# Altium PCB Connector_Board.PcbDoc
Units mil, origin at the board's own origin, x right, y up, seen from the top; angles counter-clockwise.
Board outline 3200 x 2600 mil, 2 copper layers (Top Layer, Bottom Layer); 6 components, 4 nets, 41 pads, 12 vias.
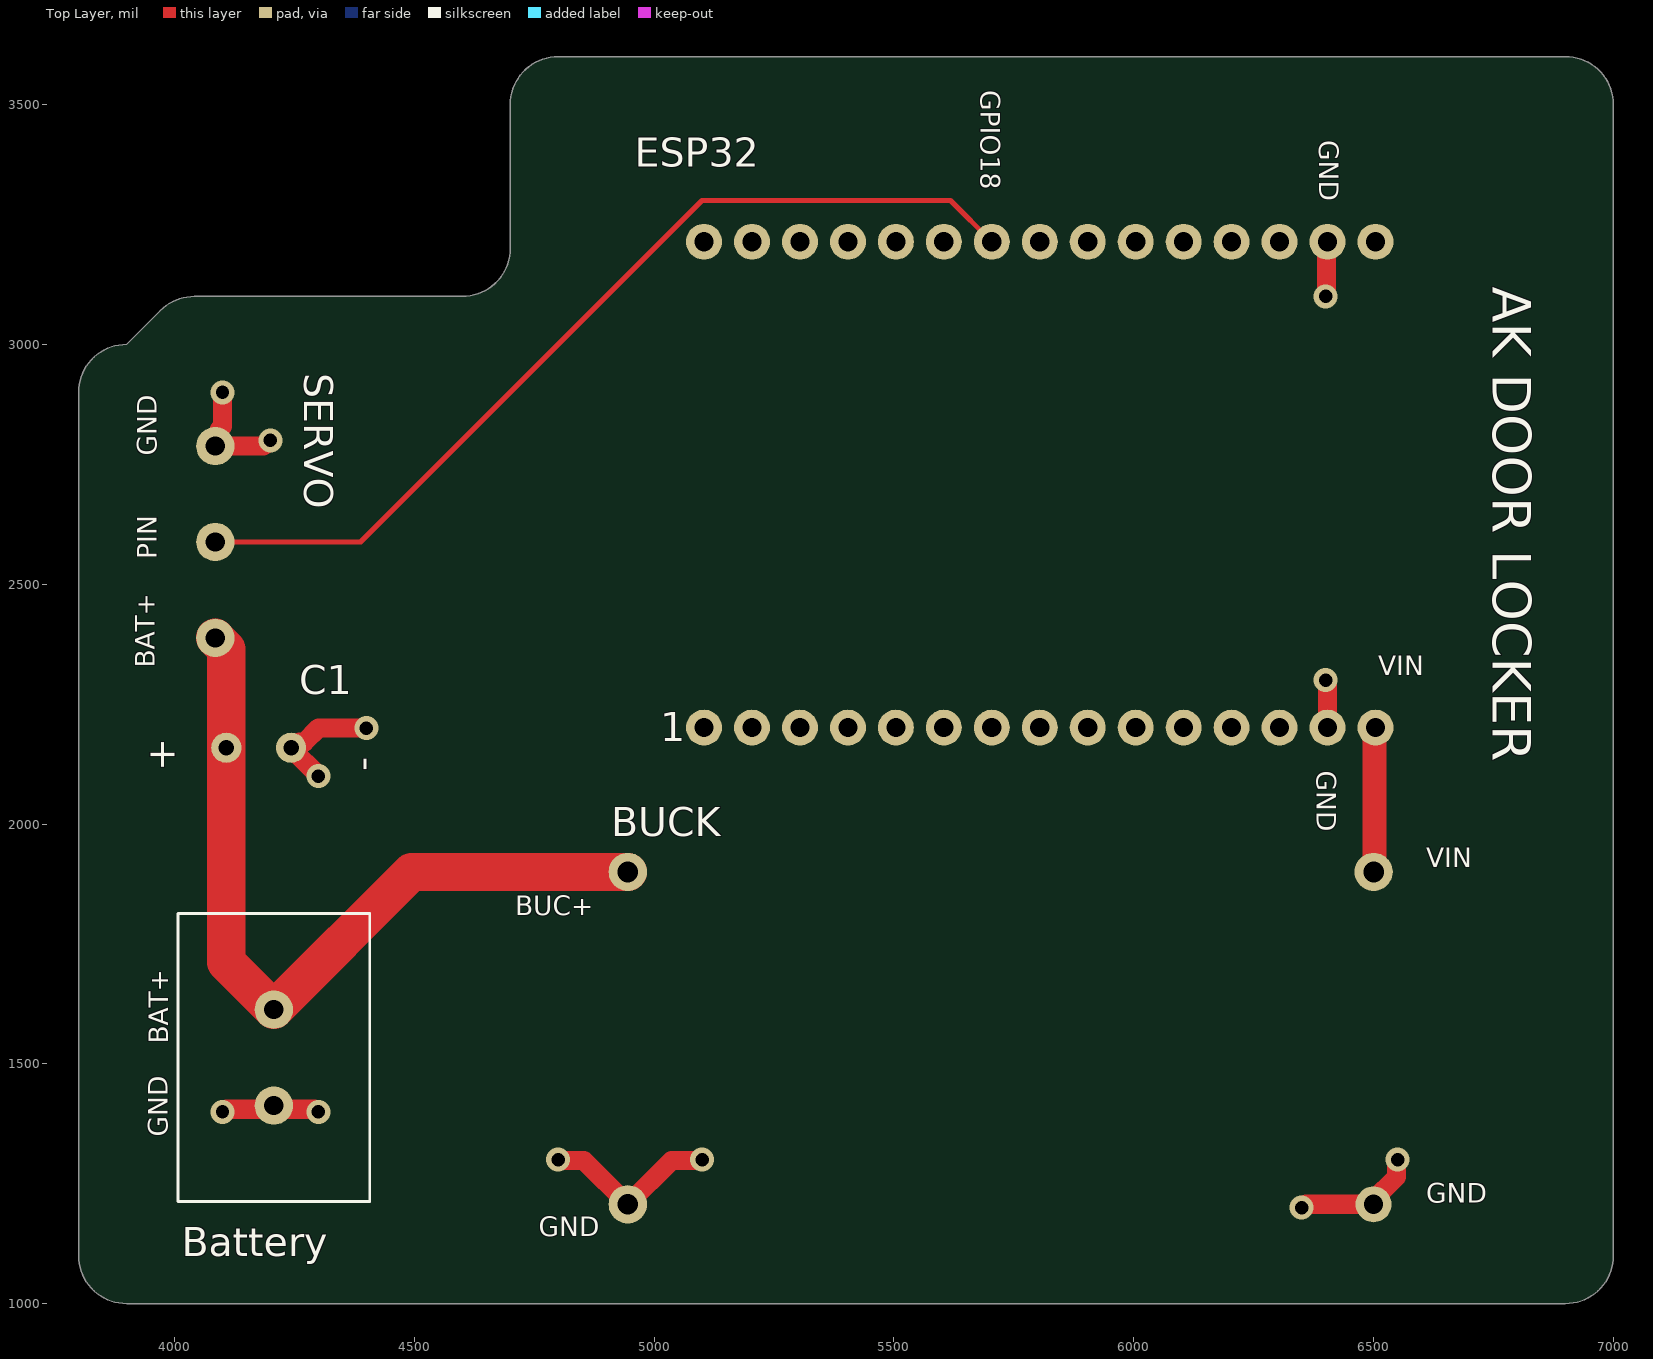
[diagram p0: Top Layer view]
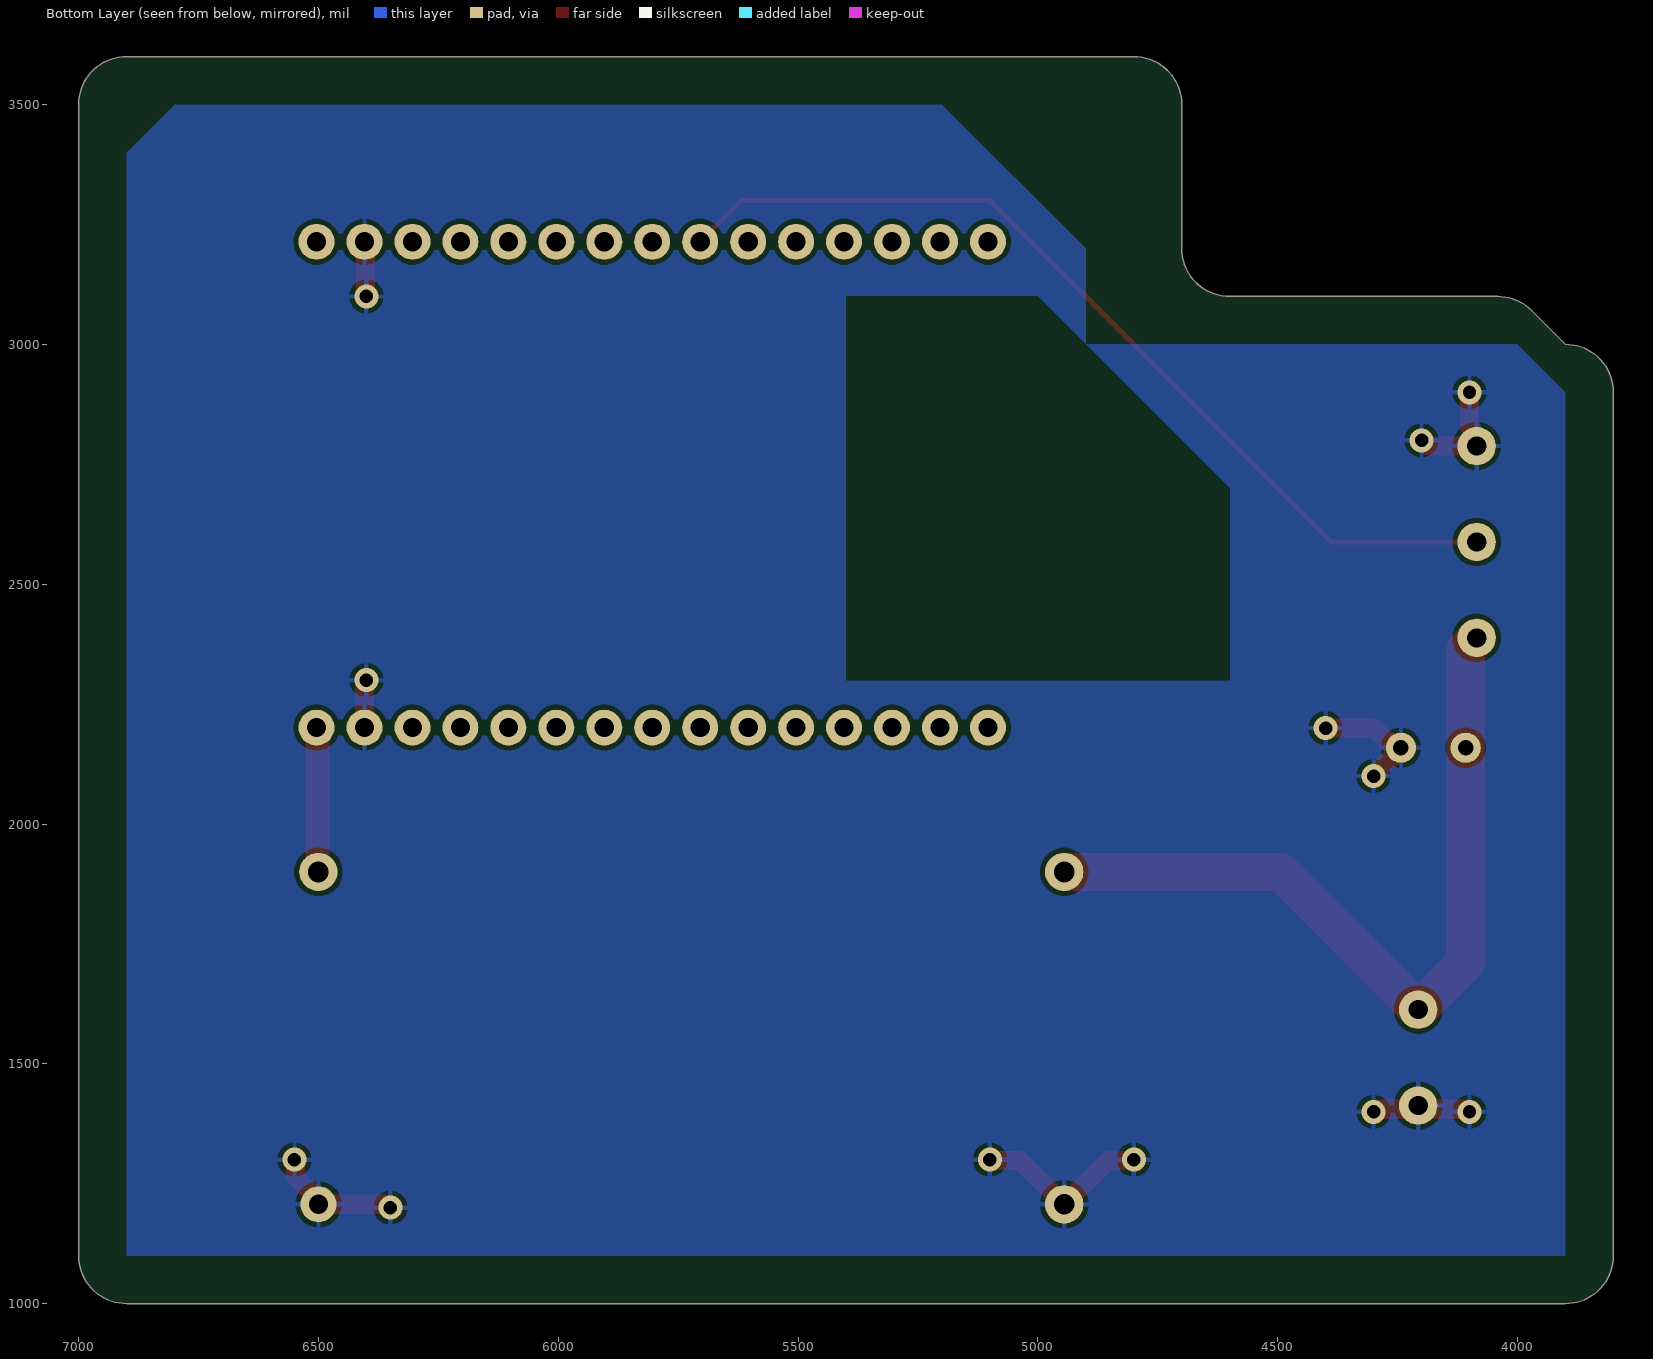
[diagram p1: Bottom Layer view, seen from below]

## Layer stack, top to bottom
Top Solder: solder mask 0.4, Solder Resist, Dk 3.5
Top Layer: signal copper 1.4
Dielectric 1: dielectric 12.6, FR-4, Dk 4.8
Bottom Layer: signal copper 1.4
Bottom Solder: solder mask 0.4, Solder Resist, Dk 3.5

## Board outline
3800,2900 cw(c3900,2900) 3900,3000 3970.71,3070.71 cw(c4041.42,3000) 4041.42,3100 4600,3100 ccw(c4600,3200) 4700,3200 4700,3500 cw(c4800,3500) 4800,3600 6900,3600 cw(c6900,3500) 7000,3500 7000,1100 cw(c6900,1100) 6900,1000 3900,1000 cw(c3900,1100) 3800,1100

## Design rules (kind name [scope] priority, off if disabled: settings)
Clearance [All] p1: gap=10 ignorepadtopadclearanceinfootprint=FALSE
PolygonConnect [All] p1: connectstyle=Relief reliefconductorwidth=10 reliefentries=4 polygonreliefangle="90 Angle" airgapwidth=10
RoutingVias [All] p1: holewidth=28 width=50 viastyle="Through Hole" minholewidth=28 minwidth=50 maxholewidth=28 maxwidth=50
SolderMaskExpansion [All] p1: expansion=4 istentingtop=FALSE
SupplyNets "Schematic Supply Nets_2" [InNet('BAT +')] p1: voltage=0.000
SupplyNets "Schematic Supply Nets_1" [InNet('VIN')] p2: voltage=0.000
SupplyNets "Schematic Supply Nets" [InNet('GND')] p3: voltage=0.000
Width [All] p1: maxlimit=100 minlimit=10 preferedwidth=10 bottomlayer_maxwidth=10 minimp=50.000000 maximp=50.000000 favimp=50.000000
30 further rules are at their usual default settings.

## Classes and differential pairs
component class door_sch: Battery C1 ESP32

## Components (designator, comment, footprint, x,y, rotation, side; value= is the part's Value field where it differs from the comment)
1 "J2 Header1x15" SOCKET_1x15_P2.54 6504,2201 r270 top
Battery "Battery connector" BAT_1x2_CONNECTOR 4207,1613 r270 top (schematic designator *)
BUCK "Buck_CONV_PINS" BUCK_1X4_CONNECTOR 4945,1900 r0 top (schematic designator *)
C1 "Capacitor" CAPCITOR_1X2 4108,2159 r90 top value=470u
ESP32 "J1 Header1x15" SOCKET_1x15_P2.54 6504,3214 r270 top (schematic designator 1)
SERVO "SERVO_PINS" SERVO_1X3_CONNECTOR 4085,2388 r90 top (schematic designator 1)

## Footprints (in the part's own frame and the unit in brackets; to place one, negate y for a bottom-side part, rotate by r counter-clockwise, add the part's x,y. Pads: shape width x height; smd on the part's side, far side on the other; paste and mask are expansions set on the pad)
BAT_1x2_CONNECTOR [mil]
  round 80 hole 40: 1(0,0) 2(200,0)
  silkscreen extent -200,-200 400,200
BUCK_1X4_CONNECTOR [mil]
  round 80 hole 43: 1(0,0) 2(0,-693) 3(1555,0)
  round 75 hole 40: 4(1555,-693)
CAPCITOR_1X2 [mil]
  round 63 hole 32: 1(0,0) 2(0,-135)
SERVO_1X3_CONNECTOR [mil]
  round 80 hole 40: 1(0,0) 2(200,0) 3(400,0)
SOCKET_1x15_P2.54 [mil]
  round 75 hole 40: 1(0,0) 2(0,-100) 3(0,-200) 4(0,-300) 5(0,-400) 6(0,-500) 7(0,-600) 8(0,-700) 9(0,-800) 10(0,-900) 11(0,-1000) 12(0,-1100) 13(0,-1200) 14(0,-1300) 15(0,-1400)

## Part data
1 ESP32: library part Header1x15, "1x15 connector for ESP32 dev board"
C1: SimulationGenericComponent=True

## Via types
v1: diameter 50, hole 28, Top Layer to Bottom Layer, 12 vias

## Nets (pads, with @x,y where several pads share a name; then routed paths per layer and width w, separated by ;. In a path a pad name is that pad's centre, name@x,y a point inside that pad or via, vN(x,y) a via of type N, cw(c..) or ccw(c..) an arc to the next point about the centre after c; other vN are vias at no path point)
"BAT +": Battery.1 BUCK.1 C1.1 SERVO.1 | length 1682.4
  Top Layer w80: SERVO.1 4108,2365 C1.1 4108,1712 Battery.1 4494,1900 BUCK.1
GND: 1.2 Battery.2 BUCK.2 BUCK.4 C1.2 ESP32.2 SERVO.3 | length 1568.2
  Top Layer w40: v1(4100,1400) 4102.71,1400 4108.05,1405.35 4199.35,1405.35 Battery.2 4214.65,1405.35 4291.95,1405.35 4297.29,1400 v1(4300,1400) ; v1(4100,2900) 4100,2829.13 4092.65,2821.78 4092.65,2795.65 SERVO.3 4185.29,2788 4197.29,2800 v1(4200,2800) ; v1(4300,2100) 4300,2101 4243,2158 C1.2 4249.22,2159 4260.72,2170.5 4270.5,2170.5 4300,2200 v1@4397.29,2200 ; v1@4802.71,1300 v1(4800,1300) 4801.91,1298.09 4853.91,1298.09 BUCK.2 5036.09,1298.09 5098.09,1298.09 v1(5100,1300) v1@5097.29,1300 ; v1(6350,1200) 6352.71,1200 6359.71,1207 BUCK.4 6500,1216.47 6548.09,1264.56 6548.09,1298.09 v1(6550,1300) ; v1(6400,2300) 6400,2297.29 6404,2293.29 1.2 ; v1(6400,3100) 6401.91,3101.91 6401.91,3211.91 ESP32.2
  other v1: 4400,2200
Net1_2: ESP32.9 SERVO.2 | length 1949.5
  Top Layer w11: SERVO.2 4388,2588 5100,3300 5618,3300 ESP32.9
VIN: 1.1 BUCK.3 | length 302.7
  Top Layer w50: BUCK.3 6502,1902 6502,2199 1.1
pads on no net: 1.3 1.4 1.5 1.6 1.7 1.8 1.9 1.10 1.11 1.12 1.13 1.14 1.15 ESP32.1 ESP32.3 ESP32.4 ESP32.5 ESP32.6 ESP32.7 ESP32.8 ESP32.10 ESP32.11 ESP32.12 ESP32.13 ESP32.14 ESP32.15

## Polygon pours and split planes (outlines as drawn)
GND on Bottom Layer "GND_L02_P000" (solid, pour order 0): 6900,1100 3900,1100 3900,2900 4000,3000 4900,3000 4900,3200 5200,3500 6800,3500 6900,3400

## Other copper
Bottom Layer:
  pour cut-out: 5400,3100 5000,3100 4600,2700 4600,2300 5400,2300
  pour cut-out: 5400,3100 5000,3100 4600,2700 4600,2400 4700,2300 5400,2300

## Silkscreen, mask and mechanical layers (free items; w line width, h text height)
Top Overlay:
  text "GPIO18" at 5681,3530 h40 r270
  text "GND" at 6387,3426 h40 r270
  text "AK DOOR LOCKER" at 6748,3120 h80 r270
  text "GND" at 3963,2768 h40 r90
  text "PIN" at 3963,2552 h40 r90
  text "BAT+" at 3959,2326 h40 r90
  text "VIN" at 6510,2310 h40
  text "GND" at 6381,2111 h40 r270
  text "VIN" at 6610,1910 h40
  text "BUC+" at 4710,1810 h40
  text "BAT+" at 3987,1542 h40 r90
  text "GND" at 3986,1348 h40 r90
  text "GND" at 6610,1210 h40
  text "GND" at 4759,1140 h40

## Text inside footprints (layer, text, board x,y; h text height)
C1: Top Overlay "-" at 4419.99,2110 h60 r90; Top Overlay "+" at 4000,2110 h60 r90